# Altium PCB SensorAnalog.PcbDoc
Units mm, origin at the board's own origin, x right, y up, seen from the top; angles counter-clockwise.
Board outline 50 x 37 mm, 4 copper layers (F.Cu, In1.Cu, In2.Cu, B.Cu); 25 components, 18 nets, 76 pads, 19 vias.
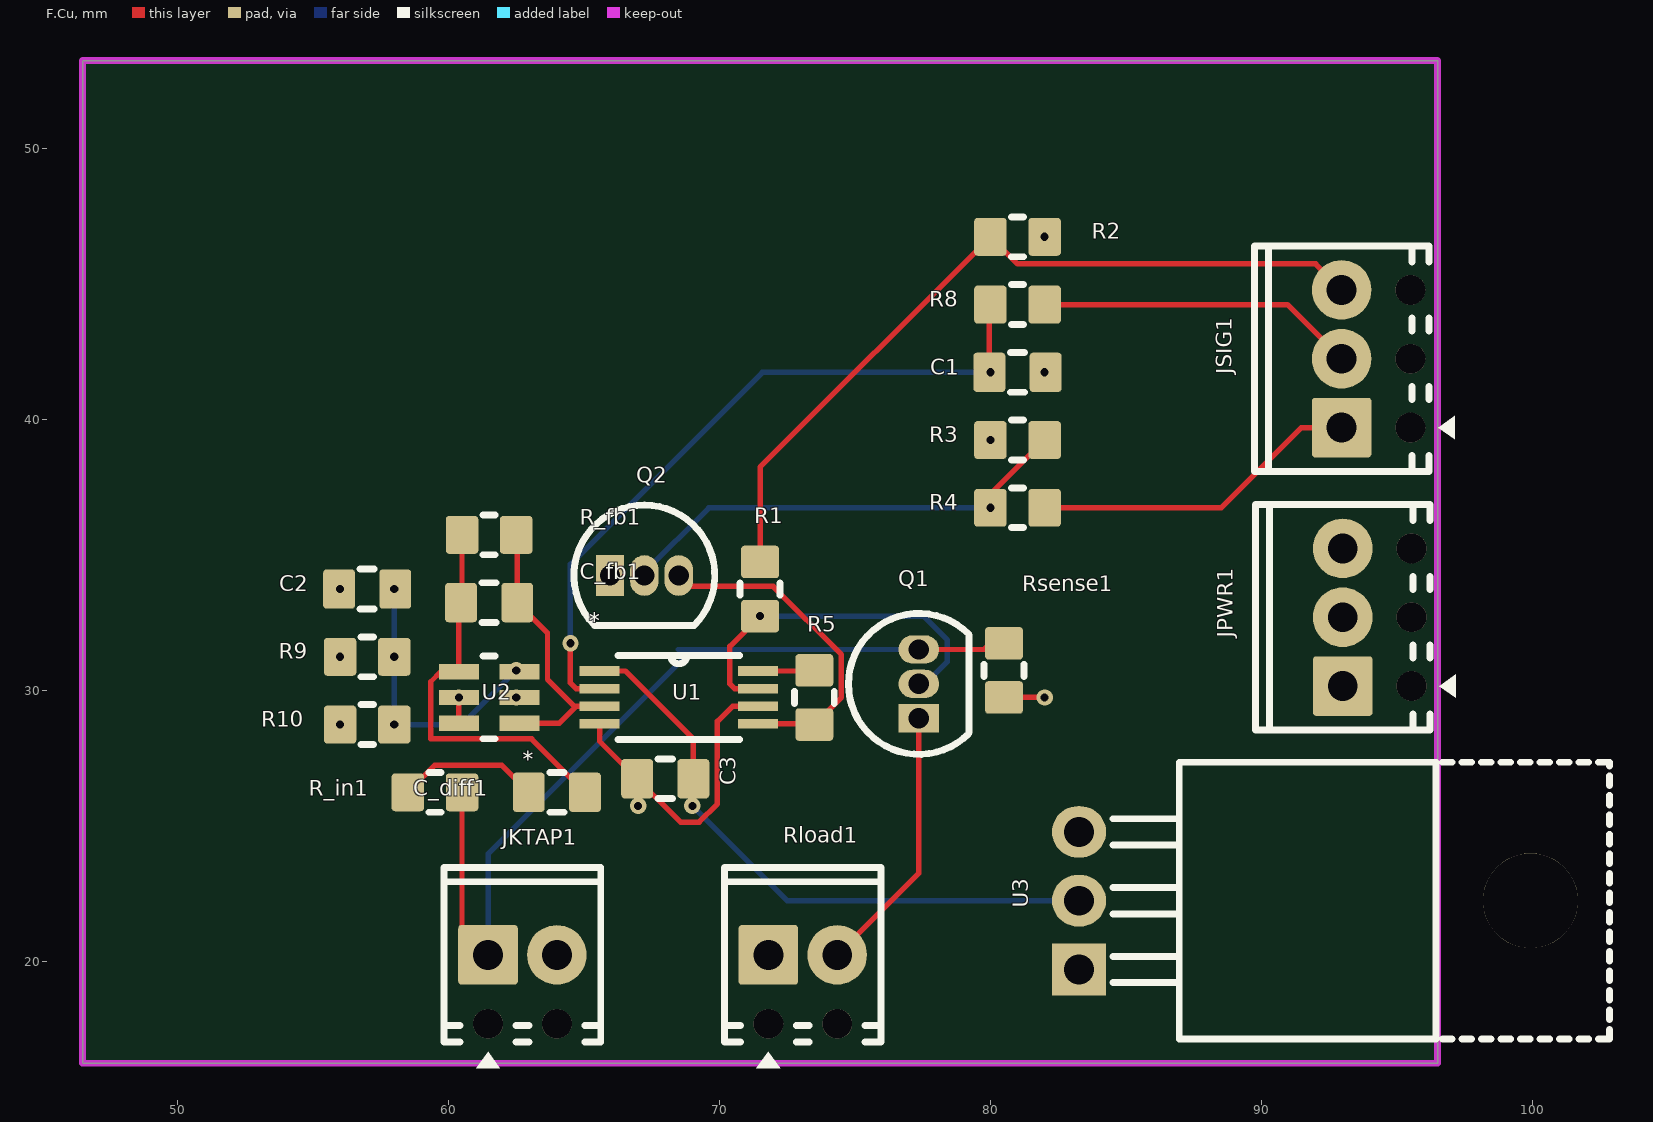
[diagram p0: F.Cu view]
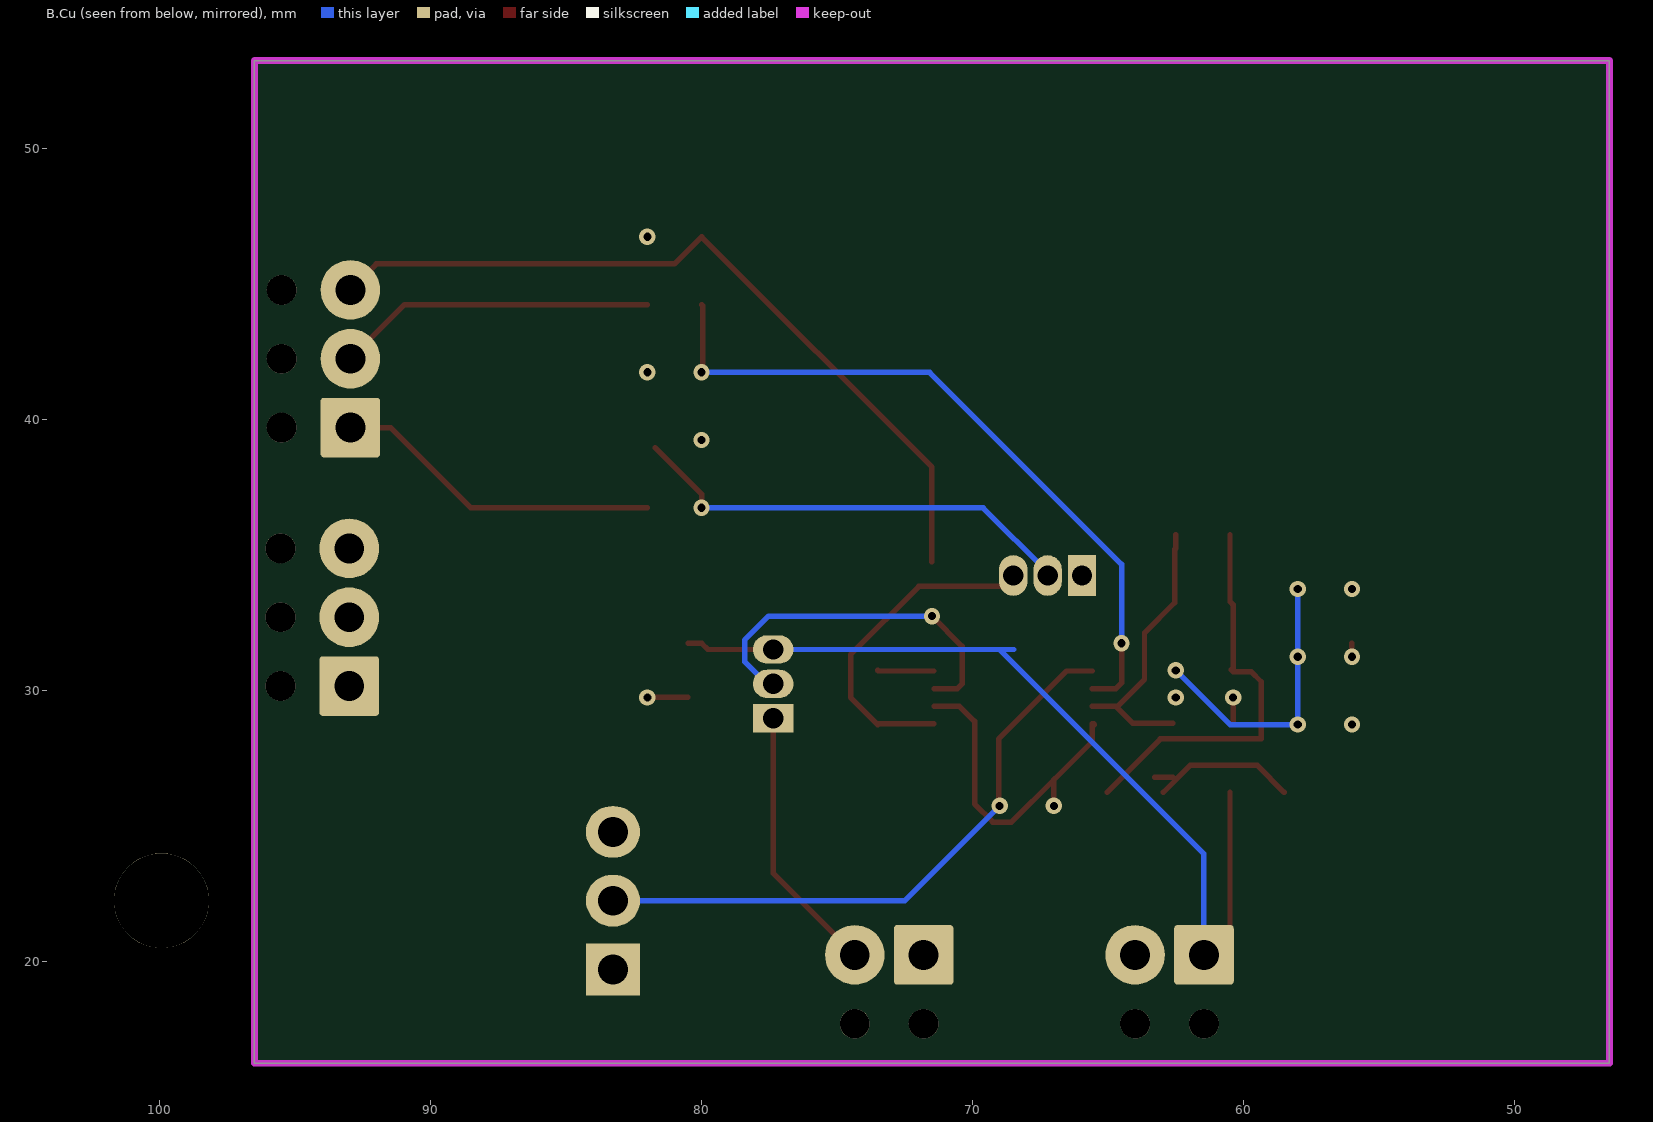
[diagram p1: B.Cu view, seen from below]
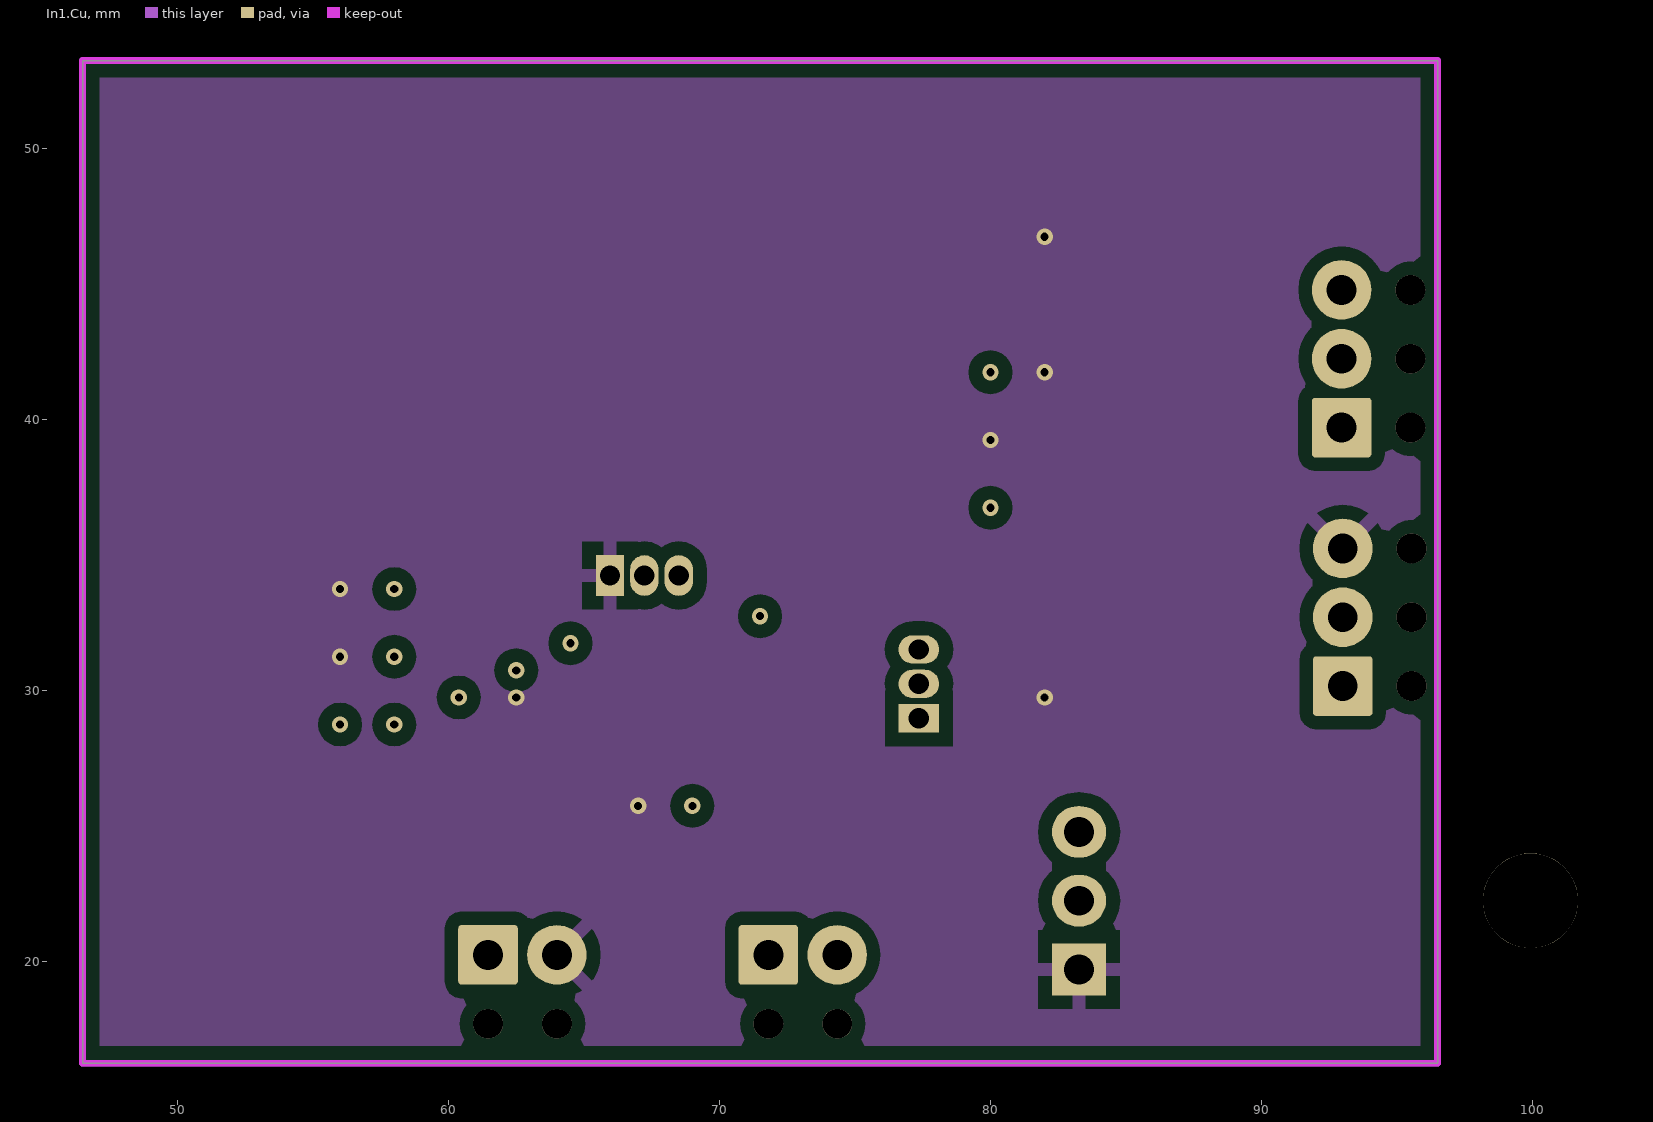
[diagram p2: In1.Cu]
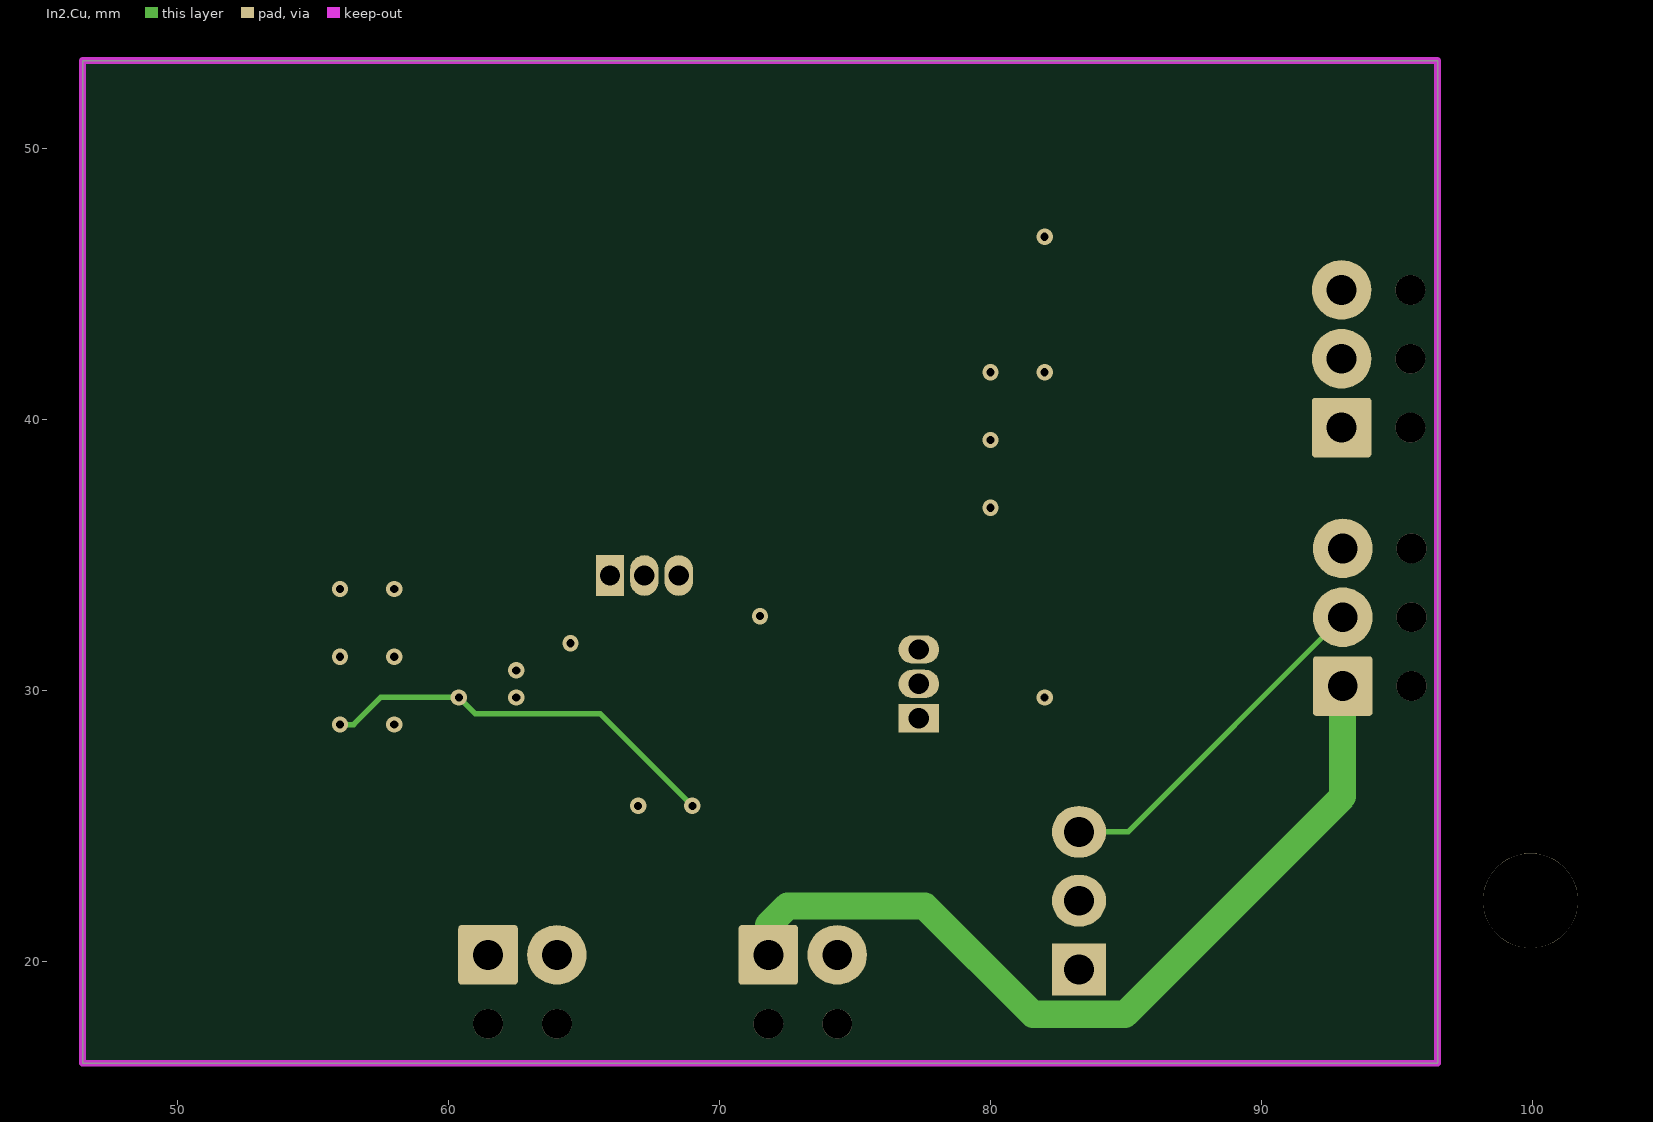
[diagram p3: In2.Cu]

## Layer stack, top to bottom
F.Mask: solder mask 0.0102, Solder Resist, Dk 3.5
F.Cu: signal copper 0.0356
Dielectric 1: dielectric 0.32, FR-4, Dk 4.8
In1.Cu: signal copper 0.0356
Dielectric2: dielectric 0.32, FR-4, Dk 4.8
In2.Cu: signal copper 0.0356
Dielectric3: dielectric 0.32, FR-4, Dk 4.8
B.Cu: signal copper 0.0356
B.Mask: solder mask 0.0102, Solder Resist, Dk 3.5

## Board outline
46.5,53.25 46.5,16.25 96.5,16.25 96.5,53.25 46.5,53.25

## Design rules (kind name [scope] priority, off if disabled: settings)
Clearance "Clearence 0.5_Polygon" [InNamedPolygon('In1.Cu-0')] p1: gap=0.5 ignorepadtopadclearanceinfootprint=FALSE
Clearance "Clearence 0.2_NetClass" [InNetClass('Default') OR InNetClass('PWR')] p2: gap=0.2 ignorepadtopadclearanceinfootprint=FALSE
MinimumSolderMaskSliver [All] p1: minsoldermaskwidth=0
PolygonConnect Polygon_In1.Cu-0_ConnectDirect [IsNamedPolygon('In1.Cu-0') vs IsVia] p1: connectstyle=Direct reliefconductorwidth=0.254 reliefentries=4 polygonreliefangle="90 Angle" airgapwidth=0.254
PolygonConnect Polygon_In1.Cu-0_ConnectRelief45 [IsNamedPolygon('In1.Cu-0') vs (IsThruPin or IsSMTPin) and (PadShape_AllLayers = 'Round')] p2: connectstyle=Relief reliefconductorwidth=0.5 reliefentries=4 polygonreliefangle="45 Angle" airgapwidth=0.5
PolygonConnect Polygon_In1.Cu-0_ConnectRelief90 [IsNamedPolygon('In1.Cu-0') vs (IsThruPin or IsSMTPin) and (PadShape_AllLayers <> 'Round')] p3: connectstyle=Relief reliefconductorwidth=0.5 reliefentries=4 polygonreliefangle="90 Angle" airgapwidth=0.5
RoutingVias [All] p1: holewidth=0.711 width=1.27 viastyle="Through Hole" minholewidth=0.711 minwidth=1.27 maxholewidth=0.711 maxwidth=1.27
SilkToSilkClearance [All] p1: silktosilkclearance=0
SilkToSolderMaskClearance [IsPad] p1: minsilkscreentomaskgap=0 clearancetoexposedcopper=TRUE
SolderMaskExpansion [All] p1: expansion=0 istentingtop=FALSE
Width [All] p1: maxlimit=10 minlimit=0.254 preferedwidth=0.2 minimp=50.000000 maximp=50.000000 favimp=50.000000
27 further rules are at their usual default settings.

## Classes and differential pairs
net class PWR: Etching_Pwr
net class Default: 0 +5V +7\V\ COMP_HAT COMP_OUT GPIO_Reset Latch Net-(C_diff1-Pad1) Net-(Q1-D) Net-(Q2-G) Net-(U2-VIN-) OPA_INPUT PIN_COMP_OUT SIGNAL_DIFF SIGNAL_DIV UNFILTERED_Vref Vref

## Components (designator, comment, footprint, x,y, rotation, side; value= is the part's Value field where it differs from the comment)
C1 "Comment" C_0805_2012Metric_Pad1.18x1.45mm_HandSolder 81,41.75 r0 top value=10n
C2 "Comment" C_0805_2012Metric_Pad1.18x1.45mm_HandSolder 57,33.75 r0 top value=1u
C3 "Comment" C_0805_2012Metric_Pad1.18x1.45mm_HandSolder 68,26.75 r0 top value=1u
C_diff1 "Comment" C_0805_2012Metric_Pad1.18x1.45mm_HandSolder 64,26.25 r0 top value=680p
C_fb1 "Comment" C_0805_2012Metric_Pad1.18x1.45mm_HandSolder 61.5,33.25 r180 top value=4.7p
JKTAP1 "Comment" TerminalBlock_Phoenix_MPT-0,5-2-2.54_1x02_P2.54mm_Horizontal 61.46,20.25 r0 top value=Screw_Terminal_01x02
JPWR1 "Comment" TerminalBlock_Phoenix_MPT-0,5-3-2.54_1x03_P2.54mm_Horizontal 93,30.17 r90 top value=Screw_Terminal_01x03
JSIG1 "Comment" TerminalBlock_Phoenix_MPT-0,5-3-2.54_1x03_P2.54mm_Horizontal 92.96,39.71 r90 top value=Screw_Terminal_01x03
Q1 "Comment" TO-92_Inline 77.36,28.98 r90 top value=BS170
Q2 "Comment" TO-92_Inline 65.96,34.25 r0 top value=2N7000
R1 "Comment" R_0805_2012Metric_Pad1.20x1.40mm_HandSolder 71.5,33.75 r90 top value=10k
R2 "Comment" R_0805_2012Metric_Pad1.20x1.40mm_HandSolder 81,46.75 r180 top value=33k
R3 "Comment" R_0805_2012Metric_Pad1.20x1.40mm_HandSolder 81,39.25 r0 top value=10k
R4 "Comment" R_0805_2012Metric_Pad1.20x1.40mm_HandSolder 81,36.75 r0 top value=1k
R5 "Comment" R_0805_2012Metric_Pad1.20x1.40mm_HandSolder 73.5,29.75 r90 top value=500
R8 "Comment" R_0805_2012Metric_Pad1.20x1.40mm_HandSolder 81,44.25 r0 top value=1k
R9 "Comment" R_0805_2012Metric_Pad1.20x1.40mm_HandSolder 57,31.25 r180 top value=10k
R10 "Comment" R_0805_2012Metric_Pad1.20x1.40mm_HandSolder 57,28.75 r0 top value=10k
R_fb1 "Comment" R_0805_2012Metric_Pad1.20x1.40mm_HandSolder 61.5,35.75 r180 top value=20k
R_in1 "Comment" R_0805_2012Metric_Pad1.20x1.40mm_HandSolder 59.5,26.25 r180 top value=20
Rload1 "Comment" TerminalBlock_Phoenix_MPT-0,5-2-2.54_1x02_P2.54mm_Horizontal 71.805,20.25 r0 top value="R='12 / (1 - 0.95 * min(max((time - T_cutoff) / T_window, 0), 1)) + (time > (T_cutoff + T_window) ? (time < (T_cutoff + T_window + T_snap) ? 200k : 10meg) : 0)'"
Rsense1 "Comment" R_0805_2012Metric_Pad1.20x1.40mm_HandSolder 80.5,30.75 r270 top value=0.1
U1 "Comment" PW8 68.5,29.75 r0 top value=TL3016CPW
U2 "Comment" DBV6 61.5,29.75 r180 top value=OPA835IDBVR
U3 "Comment" TO-220-3_Horizontal_TabUp 83.27,19.71 r90 top value=LD1117V50

## Footprints (in the part's own frame and the unit in brackets; to place one, negate y for a bottom-side part, rotate by r counter-clockwise, add the part's x,y. Pads: shape width x height; smd on the part's side, far side on the other; paste and mask are expansions set on the pad)
C_0805_2012Metric_Pad1.18x1.45mm_HandSolder [mm]
  rrect21% 1.175x1.45 smd mask+0: 1(-1.038,0) 2(1.038,0)
  silkscreen extent -0.26,-0.73 0.26,0.73
DBV6 [mil]
  rect 58x22 smd mask+0: 1(-44,37.4) 2(-44,0) 3(-44,-37.4) 4(44,-37.4) 5(44,0) 6(44,37.4)
  silkscreen extent -9,-60 9,60
PW8 [mil]
  rect 58x14 smd mask+0: 1(-115,38.39) 2(-115,12.8) 3(-115,-12.8) 4(-115,-38.39) 5(115,-38.39) 6(115,-12.8) 7(115,12.8) 8(115,38.39)
  silkscreen extent -88,-61 88,61
R_0805_2012Metric_Pad1.20x1.40mm_HandSolder [mm]
  rrect21% 1.2x1.4 smd mask+0: 1(-1,0) 2(1,0)
  silkscreen extent -0.23,-0.73 0.23,0.73
TerminalBlock_Phoenix_MPT-0,5-2-2.54_1x02_P2.54mm_Horizontal [mm]
  rrect11% 2.2x2.2 hole 1.1 paste-2539.97 mask+0: 1(0,0)
  round 2.2 hole 1.1 paste-2539.97 mask+0: 2(2.54,0)
  round 1.1 hole 1.1 paste-2539.97 mask+0: Un1(0,-2.54) Un2(2.54,-2.54)
  silkscreen extent -1.62,-4.18 4.16,3.22
TerminalBlock_Phoenix_MPT-0,5-3-2.54_1x03_P2.54mm_Horizontal [mm]
  rrect11% 2.2x2.2 hole 1.1 paste-2539.97 mask+0: 1(0,0)
  round 2.2 hole 1.1 paste-2539.97 mask+0: 2(2.54,0) 3(5.08,0)
  round 1.1 hole 1.1 paste-2539.97 mask+0: Un1(0,-2.54) Un2(2.54,-2.54) Un3(5.08,-2.54)
  silkscreen extent -1.62,-4.18 6.7,3.22
TO-92_Inline [mm]
  rect 1.05x1.5 hole 0.75 paste-2539.97 mask+0: 1(0,0)
  rrect100% 1.05x1.5 hole 0.75 paste-2539.97 mask+0: 2(1.27,0) 3(2.54,0)
  silkscreen extent -1.33,-1.85 3.87,2.6
TO-220-3_Horizontal_TabUp [mm]
  rect 1.905x2 hole 1.1 paste-2539.97 mask+0: 1(0,0)
  rrect100% 1.905x2 hole 1.1 paste-2539.97 mask+0: 2(2.54,0) 3(5.08,0)
  round 3.5 hole 3.5 paste-2539.97 mask+0: Un1(2.54,-16.66)
  silkscreen extent -2.57,-19.57 7.65,-1.26

## Part data
C1 C2 C3 C_diff1 C_fb1: library part C_0805_2012Metric_Pad1.18x1.45mm_HandSolder, "Capacitor SMD 0805 (2012 Metric), square (rectangular) end terminal, IPC-7351 nominal with elongated pad for handsoldering. (Body size source: IPC-SM-782 page 76, https://www.pcb-3d.com/wordpress/wp-content/uploads/ipc-sm-782a_amendment_1_and_2.pdf, https://docs.google.com/spreadsheets/d/1BsfQQcO9C6DZCsRaXUlFlo91Tg2WpOkGARC1WS5S8t0/edit?usp=sharing)", Description="Unpolarized capacitor", KiLib_Generator=SMD_2terminal_chip_molded, ki_fp_filters=C_*
JKTAP1 Rload1: library part TerminalBlock_Phoenix_MPT-0,5-2-2.54_1x02_P2.54mm_Horizontal, "Terminal Block Phoenix MPT-0,5-2-2.54, 2 pins, pitch 2.54mm, size 5.54x6.2mm, drill diameter 1.1mm, pad diameter 2.2mm, http://www.mouser.com/ds/2/324/ItemDetail_1725656-920552.pdf", KiLib_Generator=terminal_block/Phoenix
  JKTAP1: Description="Generic screw terminal, single row, 01x02, script generated (kicad-library-utils/schlib/autogen/connector/)", ki_fp_filters=TerminalBlock*:*
  Rload1: Description=Resistor, ki_fp_filters=R_*
JPWR1 JSIG1: library part TerminalBlock_Phoenix_MPT-0,5-3-2.54_1x03_P2.54mm_Horizontal, "Terminal Block Phoenix MPT-0,5-3-2.54, 3 pins, pitch 2.54mm, size 8.08x6.2mm, drill diameter 1.1mm, pad diameter 2.2mm, http://www.mouser.com/ds/2/324/ItemDetail_1725656-920552.pdf", Description="Generic screw terminal, single row, 01x03, script generated (kicad-library-utils/schlib/autogen/connector/)", KiLib_Generator=terminal_block/Phoenix, ki_fp_filters=TerminalBlock*:*
Q1 Q2: library part TO-92_Inline, "TO-92 leads in-line, narrow, oval pads, drill 0.75mm (see NXP sot054_po.pdf)", Sim.Device=SUBCKT, ki_fp_filters=TO?92*
  Q1: Datasheet=https://www.onsemi.com/pub/Collateral/BS170-D.PDF, Description="0.5A Id, 60V Vds, N-Channel MOSFET, TO-92", Sim.Library="C:\Users\Luca Notti\Desktop\Kicad Libraries\NeedleFab\BS170_3PIN.mod", Sim.Name=BS/MMBF170, Sim.Pins="1=20 2=10 3=30"
  Q2: Datasheet=https://www.vishay.com/docs/70226/70226.pdf, Description="0.2A Id, 200V Vds, N-Channel MOSFET, 2.6V Logic Level, TO-92", Sim.Library="C:\Users\Luca Notti\Desktop\Kicad Libraries\NeedleFab\2N7000.REV0.LIB", Sim.Name=2n7000, Sim.Pins="1=3 2=2 3=1"
R1 R2 R3 R4 R5 R8 R9 R10 R_fb1 R_in1 Rsense1: library part R_0805_2012Metric_Pad1.20x1.40mm_HandSolder, "Resistor SMD 0805 (2012 Metric), square (rectangular) end terminal, IPC-7351 nominal with elongated pad for handsoldering. (Body size source: IPC-SM-782 page 72, https://www.pcb-3d.com/wordpress/wp-content/uploads/ipc-sm-782a_amendment_1_and_2.pdf)", Description=Resistor, KiLib_Generator=SMD_2terminal_chip_molded, ki_fp_filters=R_*
U1: library part PW8, Datasheet=https://www.ti.com/lit/gpn/tl3016, Sim.Library="C:\Users\Luca Notti\Desktop\Kicad Libraries\NeedleFab\TL3016_TINA_AIO\TL3016.LIB", Sim.Name=TL3016, Sim.Device=SUBCKT, Sim.Pins="1=VCC+ 2=IN+ 3=IN- 4=VCC- 5=LE 6=GRND 7=QOUT 8=QBOUT", ki_fp_filters="PW8 PW8-M PW8-L"
U2: library part DBV6, Datasheet=https://www.ti.com/lit/gpn/opa835, Sim.Library="C:\Users\Luca Notti\Desktop\Kicad Libraries\NeedleFab\OPA835.lib", Sim.Name=OPA835, Sim.Device=SUBCKT, Sim.Pins="1=VOUT 2=VEE 3=VINP 4=VINM 5=PD 6=VCC", ki_fp_filters="DBV6 DBV6-M DBV6-L"
U3: library part TO-220-3_Horizontal_TabUp, "TO-220-3, Horizontal, RM 2.54mm, see https://www.vishay.com/docs/66542/to-220-1.pdf", Datasheet=https://www.st.com/resource/en/datasheet/ld1117.pdf, Description="800 mA Fixed Low Drop Positive Voltage Regulator (ldo). Max input 15V. Fixed Output 5.0V. TO-220-3", KiLib_Generator=package/TO_SOT/THT, Sim.Library="C:\Users\Luca Notti\Desktop\Kicad Libraries\NeedleFab\LD1117V50.lib", Sim.Name=LD1117V50, Sim.Device=SUBCKT, Sim.Pins="1=1 2=2 3=3", ki_fp_filters=*TO*220*

## Via types
v1: diameter 0.6, hole 0.3, F.Cu to B.Cu, tented both sides, 19 vias

## Nets (pads, with @x,y where several pads share a name; then routed paths per layer and width w, separated by ;. In a path a pad name is that pad's centre, name@x,y a point inside that pad or via, vN(x,y) a via of type N, cw(c..) or ccw(c..) an arc to the next point about the centre after c; other vN are vias at no path point)
0: C1.2 C2.1 C3.1 JKTAP1.2 JPWR1.3 Q2.1 R2.1 R3.1 R9.2 Rsense1.2 U1.4 U1.6 U2.2 U3.1 | length 14.5
  F.Cu w0.2: C2.1 v1(56,33.75) ; v1(56,31.25) R9.2@56,31.75 ; v1(62.5,29.75) U2.2 ; U1.4@65.5,28.75 U1.4@65.525,28.775 ; U1.4 65.579,28.133 C3.1 ; v1(67,25.75) 67,26.713 C3.1 ; U1.6 70.484,29.425 69.925,28.866 69.925,25.826 69.249,25.15 68.562,25.15 C3.1 ; Rsense1.2 v1(82,29.75) ; v1(82,41.75) C1.2
  other v1: 80,39.25 82,46.75
+5V: C3.2 R10.1 U1.1 U2.5 U2.6 U3.2 | length 38.7
  F.Cu w0.2: U2.6 v1(60.382,29.75) ; U1.1 66.525,30.725 69.037,28.213 C3.2 69.037,25.787 v1(69,25.75)
  In2.Cu w0.2: v1(56,28.75) 56.5,28.75 57.5,29.75 v1(60.382,29.75) 60.982,29.15 65.6,29.15 v1(69,25.75)
  B.Cu w0.2: v1(69,25.75) 72.5,22.25 U3.2
+7\V\: JPWR1.2 U3.3 | length 13
  In2.Cu w0.2: U3.3 85.08,24.79 JPWR1.2
COMP_HAT: R5.2 U1.8 | length 2.1
  F.Cu w0.2: U1.8 73.475,30.725 R5.2
COMP_OUT: Q1.2 R1.1 U1.7 | length 13.5
  F.Cu w0.2: U1.7 70.557,30.075 70.384,30.247 70.384,31.634 v1(71.5,32.75)
  B.Cu w0.2: v1(71.5,32.75) 77.522,32.75 78.41,31.862 78.41,31.075 77.585,30.25 Q1.2
Etching_Pwr: JPWR1.1 Rload1.1 | length 31.6
  In2.Cu w1: Rload1.1 71.805,21.35 72.505,22.05 77.578,22.05 81.57,18.058 84.97,18.058 93,26.088 JPWR1.1
GPIO_Reset: JSIG1.1 R4.2 | length 12.2
  F.Cu w0.2: R4.2 88.513,36.75 91.472,39.71 JSIG1.1
Latch: Q2.3 R5.1 U1.5 | length 12.3
  F.Cu w0.2: Q2.3 68.9,33.85 71.985,33.85 74.5,31.335 74.5,29.75 R5.1 73.475,28.775 U1.5
Net-(C_diff1-Pad1): C_diff1.1 R_in1.2 | length 6
  F.Cu w0.2: R_in1.2 59.5,27.25 61.962,27.25 C_diff1.1 ; C_diff1.1@62.618,26.8 C_diff1.1@63.284,26.8
Net-(Q1-D): Q1.1 Rload1.2 | length 10
  F.Cu w0.2: Rload1.2 77.36,23.265 Q1.1
Net-(Q2-G): Q2.2 R3.2 R4.1 | length 16.8
  F.Cu w0.2: v1(80,36.75) 80,37.25 R3.2@81.717,38.967
  B.Cu w0.2: Q2.2 67.23,34.372 69.608,36.75 v1(80,36.75)
Net-(U2-VIN-): C_diff1.2 C_fb1.2 R_fb1.2 U2.4 | length 15
  F.Cu w0.2: U2.4@60.463,30.78 U2.4 ; R_fb1.2 60.5,33.288 C_fb1.2 60.382,33.17 U2.4 ; C_diff1.2 63.067,28.221 59.346,28.221 59.346,30.329 59.716,30.7 U2.4
OPA_INPUT: C2.2 R9.1 R10.2 U2.3 | length 10.5
  F.Cu w0.2: v1(58,33.75) C2.2 ; v1(62.5,30.75) 62.55,30.7 U2.3
  B.Cu w0.2: v1(58,33.75) v1(58,31.25) v1(58,28.75) 60.5,28.75 v1(62.5,30.75)
PIN_COMP_OUT: JSIG1.3 R1.2 R2.2 | length 29.3
  F.Cu w0.2: R1.2 71.5,38.25 R2.2 81,45.75 92,45.75 JSIG1.3
SIGNAL_DIFF: C_fb1.1 R_fb1.1 U1.3 U2.1 | length 11.4
  F.Cu w0.2: R_fb1.1 62.5,35.25 62.538,35.213 C_fb1.1 63.654,32.133 63.654,30.413 64.642,29.425 U1.3 64.715,29.425 64.09,28.8 U2.1
SIGNAL_DIV: JKTAP1.1 Q1.3 R_in1.1 Rsense1.1 | length 32.9
  F.Cu w0.2: R_in1.1 60.5,21.21 JKTAP1.1 ; Q1.3 79.77,31.52 80,31.75 Rsense1.1
  B.Cu w0.2: JKTAP1.1 61.46,23.98 69,31.52 ; 68.47,31.52 69,31.52 ; Q1.3 76,31.52 69,31.52
UNFILTERED_Vref: JSIG1.2 R8.2 | length 11.8
  F.Cu w0.2: R8.2 90.96,44.25 JSIG1.2
Vref: C1.1 R8.1 U1.2 | length 26.5
  F.Cu w0.2: v1(64.5,31.75) 64.5,30.29 64.715,30.075 U1.2 ; C1.1 79.962,44.212 R8.1
  B.Cu w0.2: v1(64.5,31.75) 64.5,34.665 71.585,41.75 v1(80,41.75)
pads on no net: JKTAP1.Un1 JKTAP1.Un2 JPWR1.Un1 JPWR1.Un2 JPWR1.Un3 JSIG1.Un1 JSIG1.Un2 JSIG1.Un3 Rload1.Un1 Rload1.Un2 U3.Un1
copper on no net: | length 174
  In1.Cu w0.254: 46.5,16.25 96.5,16.25 96.5,53.25 46.5,53.25 46.5,16.25

## Polygon pours and split planes (outlines as drawn)
0 on In1.Cu "In1.Cu-0" (solid, remove dead copper, pour order 0): 96.5,53.25 46.5,53.25 46.5,16.25 96.5,16.25

## Keep-outs
Edge.Cuts:
  lines w0: 46.5,16.25 96.5,16.25 96.5,53.25 46.5,53.25 46.5,16.25
  lines w0.254: 46.5,16.25 96.5,16.25 96.5,53.25 46.5,53.25 46.5,16.25

## Text inside footprints (layer, text, board x,y; h text height)
U1: F.Fab "*" at 65.203,32.107 h1; F.Fab "*" at 65.203,32.107 h1; F.SilkS "*" at 65.203,32.107 h1; F.SilkS "*" at 65.203,32.107 h1
U2: F.Fab "*" at 62.749,26.981 h1; F.Fab "*" at 62.749,26.981 h1; F.SilkS "*" at 62.749,26.981 h1; F.SilkS "*" at 62.749,26.981 h1